# Allegro board parallella_layout.brd
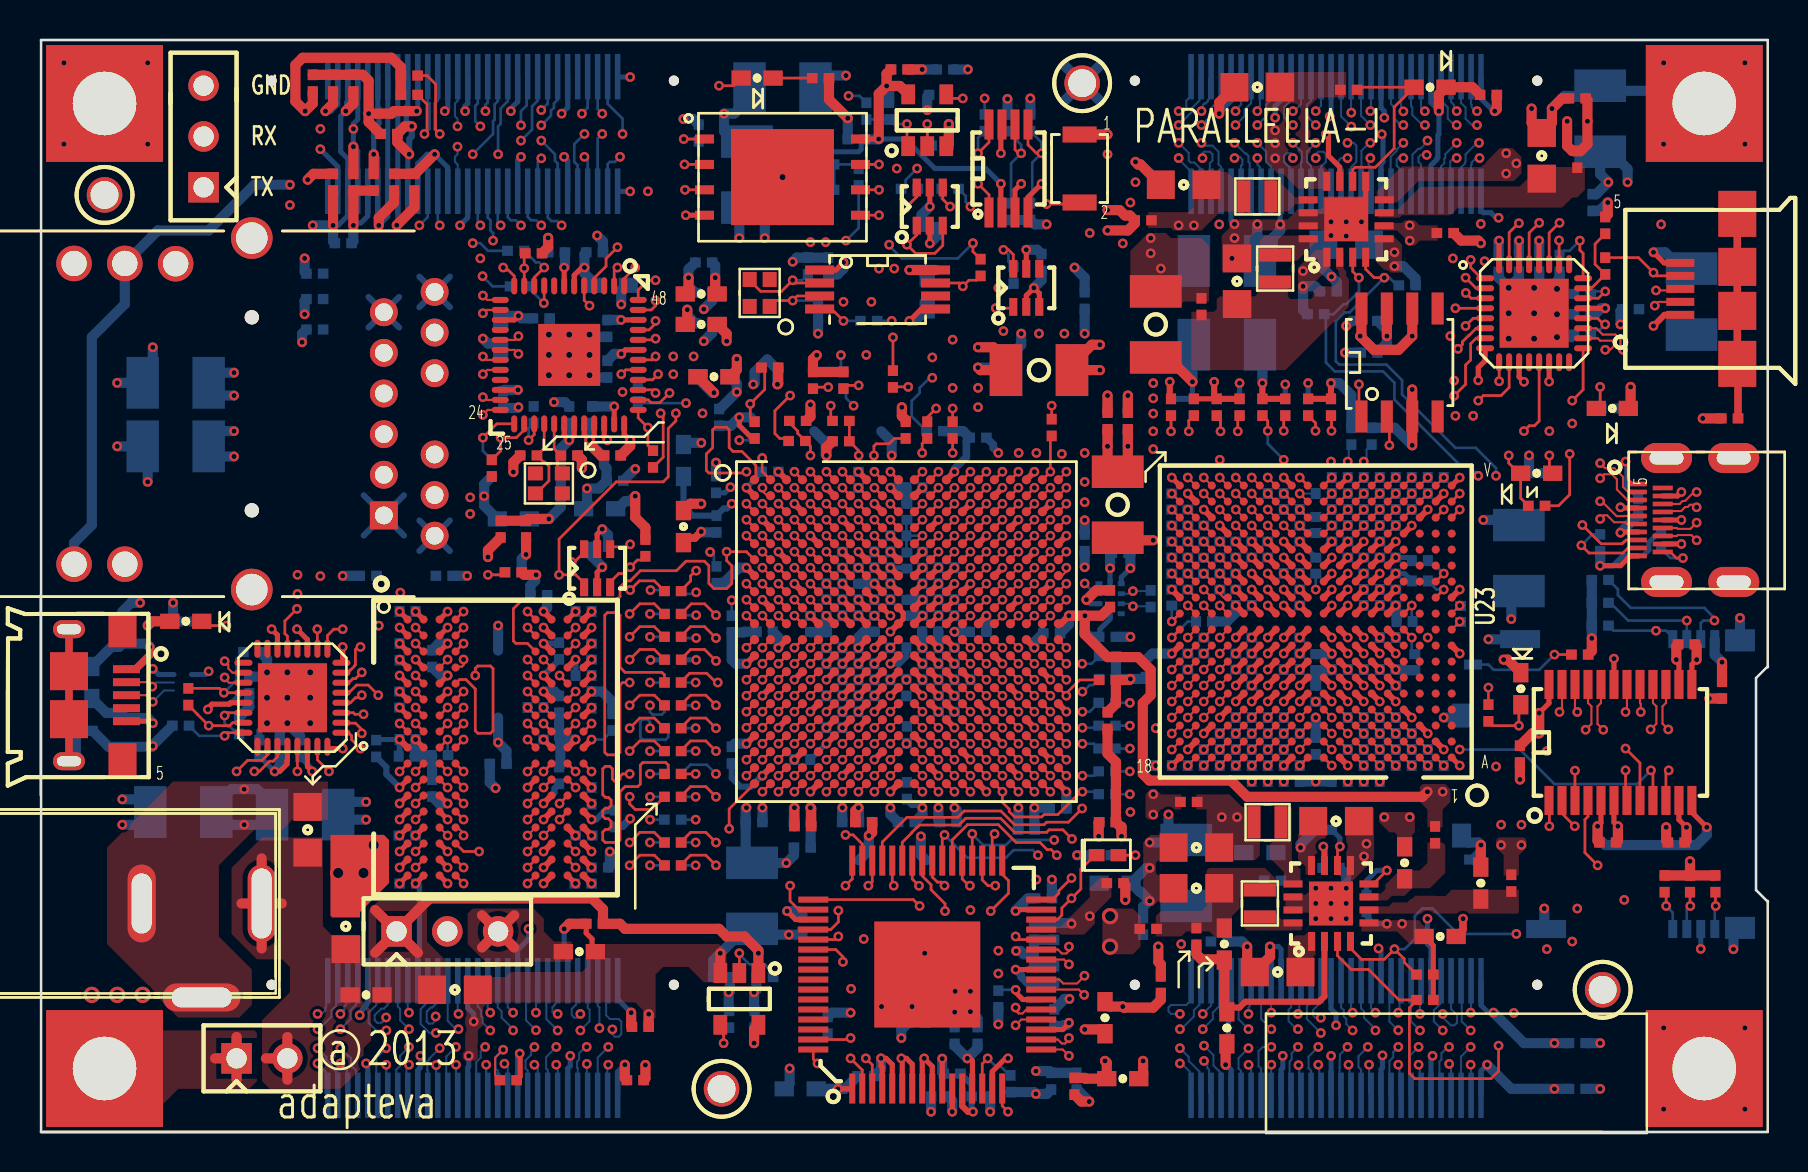
[diagram p0: board, top side]
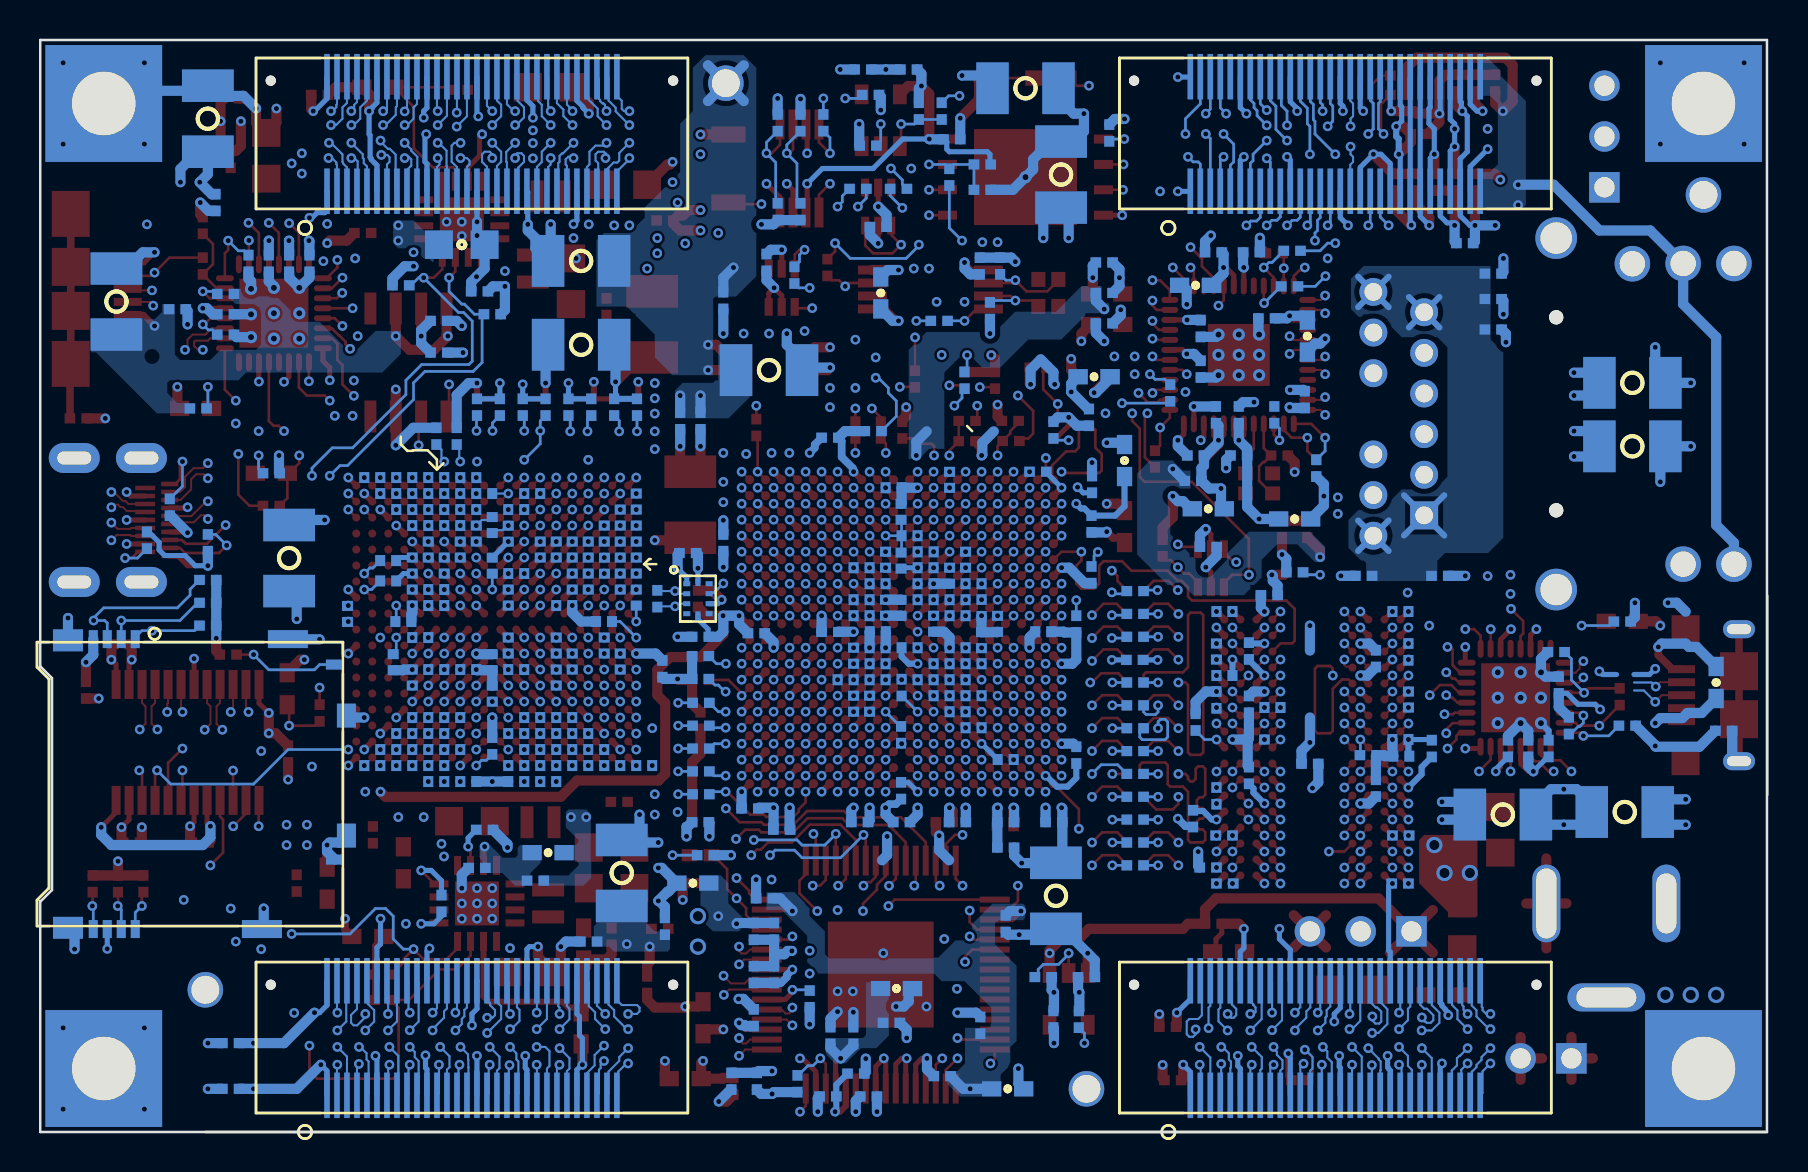
[diagram p1: board, bottom side, seen from below]

Outline 86.43 x 54.61 mm; copper layers: TOP, L2_GND, L3_SIG, L4_GND, L5_SIG, L6_PWR, L7_PWR, L8_SIG, L9_GND, L10_SIG, L11_GND, BOTTOM. Coordinates in mm from the lower left corner of the outline.
Outline path: 0.05,0 0.05,54.61 86.41,54.61 86.41,23.24 ; 0.05,0 78.16,0 ; 0.05,0 86.41,0 86.41,11.56

## Design rules (mm)
net group DDR3_A0: nets DDR3_A0 DDR_A0
net group DDR3_A1: nets DDR3_A1 DDR_A1
net group DDR3_A2: nets DDR3_A2 DDR_A2
net group DDR3_A3: nets DDR3_A3 DDR_A3
net group DDR3_A4: nets DDR3_A4 DDR_A4
net group DDR3_A5: nets DDR3_A5 DDR_A5
net group DDR3_A6: nets DDR3_A6 DDR_A6
net group DDR3_A7: nets DDR3_A7 DDR_A7
net group DDR3_A8: nets DDR3_A8 DDR_A8
net group DDR3_A9: nets DDR3_A9 DDR_A9
net group DDR3_A10: nets DDR3_A10 DDR_A10
net group DDR3_A11: nets DDR3_A11 DDR_A11
net group DDR3_A12: nets DDR3_A12 DDR_A12
net group DDR3_A13: nets DDR3_A13 DDR_A13
net group DDR3_A14: nets DDR3_A14 DDR_A14
net group DDR3_BA0: nets DDR3_BA0 DDR_BA0
net group DDR3_BA1: nets DDR3_BA1 DDR_BA1
net group DDR3_BA2: nets DDR3_BA2 DDR_BA2
net group DDR3_CAS_L: nets DDR3_CAS_L DDR_CAS_L
net group DDR3_CKE: nets DDR3_CKE DDR_CKE
net group DDR3_CS_L: nets DDR3_CS_L DDR_CS_L
net group DDR3_ODT: nets DDR3_ODT DDR_ODT
net group DDR3_RAS_L: nets DDR3_RAS_L DDR_RAS_L
net group DDR3_WE_L: nets DDR3_WE_L DDR_WE_L
net group DDR_ADDR_MATCH: nets DDR_CLK_N DDR_CLK_P
net group HDMI_TX0: nets HDMI_TX0_N HDMI_TX0_P
net group HDMI_TX1: nets HDMI_TX1_N HDMI_TX1_P
net group HDMI_TX2: nets HDMI_TX2_N HDMI_TX2_P
net group HDMI_TXC: nets HDMI_TXC_N HDMI_TXC_P
net group P0_USB_D: nets P0_USB_DN P0_USB_DP
net group P1_USB_D: nets P1_USB_DN P1_USB_DP
net group PHY_MDI0: nets PHY_MDI0N PHY_MDI0P
net group PHY_MDI1: nets PHY_MDI1N PHY_MDI1P
net group PHY_MDI2: nets PHY_MDI2N PHY_MDI2P
net group PHY_MDI3: nets PHY_MDI3N PHY_MDI3P
net group RXI_CCLK: nets RXI_CCLK_N RXI_CCLK_P
net group RXI_EA_DATA0: nets RXI_EA_DATA0_N RXI_EA_DATA0_P
net group RXI_EA_DATA1: nets RXI_EA_DATA1_N RXI_EA_DATA1_P
net group RXI_EA_DATA2: nets RXI_EA_DATA2_N RXI_EA_DATA2_P
net group RXI_EA_DATA3: nets RXI_EA_DATA3_N RXI_EA_DATA3_P
net group RXI_EA_DATA4: nets RXI_EA_DATA4_N RXI_EA_DATA4_P
net group RXI_EA_DATA5: nets RXI_EA_DATA5_N RXI_EA_DATA5_P
net group RXI_EA_DATA6: nets RXI_EA_DATA6_N RXI_EA_DATA6_P
net group RXI_EA_DATA7: nets RXI_EA_DATA7_N RXI_EA_DATA7_P
net group RXI_EA_FRAME: nets RXI_EA_FRAME_N RXI_EA_FRAME_P
net group RXI_EA_LCLK: nets RXI_EA_LCLK_N RXI_EA_LCLK_P
net group RXO_EA_RD_WAIT: nets RXO_EA_RD_WAIT_N RXO_EA_RD_WAIT_P
net group RXO_EA_WR_WAIT: nets RXO_EA_WR_WAIT_N RXO_EA_WR_WAIT_P
net group TXI_EA_RD_WAIT: nets TXI_EA_RD_WAIT_N TXI_EA_RD_WAIT_P
net group TXI_EA_WR_WAIT: nets TXI_EA_WR_WAIT_N TXI_EA_WR_WAIT_P
net group TXO_EA_DATA0: nets TXO_EA_DATA0_N TXO_EA_DATA0_P
net group TXO_EA_DATA1: nets TXO_EA_DATA1_N TXO_EA_DATA1_P
net group TXO_EA_DATA2: nets TXO_EA_DATA2_N TXO_EA_DATA2_P
net group TXO_EA_DATA3: nets TXO_EA_DATA3_N TXO_EA_DATA3_P
net group TXO_EA_DATA4: nets TXO_EA_DATA4_N TXO_EA_DATA4_P
net group TXO_EA_DATA5: nets TXO_EA_DATA5_N TXO_EA_DATA5_P
net group TXO_EA_DATA6: nets TXO_EA_DATA6_N TXO_EA_DATA6_P
net group TXO_EA_DATA7: nets TXO_EA_DATA7_N TXO_EA_DATA7_P
net group TXO_EA_FRAME: nets TXO_EA_FRAME_N TXO_EA_FRAME_P
net group VADC: nets VADC_N VADC_P
net group CONNECTOR1_MATCH: nets RXI_NO_DATA0_N RXI_NO_DATA0_P RXI_NO_DATA1_N RXI_NO_DATA1_P RXI_NO_DATA2_N RXI_NO_DATA2_P RXI_NO_DATA3_N RXI_NO_DATA3_P RXI_NO_DATA4_N RXI_NO_DATA4_P RXI_NO_DATA5_N RXI_NO_DATA5_P RXI_NO_DATA6_N RXI_NO_DATA6_P RXI_NO_DATA7_N RXI_NO_DATA7_P RXI_NO_FRAME_N RXI_NO_FRAME_P RXI_NO_LCLK_N RXI_NO_LCLK_P RXO_NO_RD_WAIT_N RXO_NO_RD_WAIT_P RXO_NO_WR_WAIT_N RXO_NO_WR_WAIT_P TXI_NO_RD_WAIT_N TXI_NO_RD_WAIT_P TXI_NO_WR_WAIT_N TXI_NO_WR_WAIT_P TXO_NO_DATA0_N TXO_NO_DATA0_P TXO_NO_DATA1_N TXO_NO_DATA1_P TXO_NO_DATA2_N TXO_NO_DATA2_P TXO_NO_DATA3_N TXO_NO_DATA3_P TXO_NO_DATA4_N TXO_NO_DATA4_P TXO_NO_DATA5_N TXO_NO_DATA5_P TXO_NO_DATA6_N TXO_NO_DATA6_P TXO_NO_DATA7_N TXO_NO_DATA7_P TXO_NO_FRAME_N TXO_NO_FRAME_P TXO_NO_LCLK_N TXO_NO_LCLK_P
net group CONNECTOR2_MATCH: nets RXI_SO_DATA0_N RXI_SO_DATA0_P RXI_SO_DATA1_N RXI_SO_DATA1_P RXI_SO_DATA2_N RXI_SO_DATA2_P RXI_SO_DATA3_N RXI_SO_DATA3_P RXI_SO_DATA4_N RXI_SO_DATA4_P RXI_SO_DATA5_N RXI_SO_DATA5_P RXI_SO_DATA6_N RXI_SO_DATA6_P RXI_SO_DATA7_N RXI_SO_DATA7_P RXI_SO_FRAME_N RXI_SO_FRAME_P RXI_SO_LCLK_N RXI_SO_LCLK_P RXO_SO_RD_WAIT_N RXO_SO_RD_WAIT_P RXO_SO_WR_WAIT_N RXO_SO_WR_WAIT_P TXI_SO_RD_WAIT_N TXI_SO_RD_WAIT_P TXI_SO_WR_WAIT_N TXI_SO_WR_WAIT_P TXO_SO_DATA0_N TXO_SO_DATA0_P TXO_SO_DATA1_N TXO_SO_DATA1_P TXO_SO_DATA2_N TXO_SO_DATA2_P TXO_SO_DATA3_N TXO_SO_DATA3_P TXO_SO_DATA4_N TXO_SO_DATA4_P TXO_SO_DATA5_N TXO_SO_DATA5_P TXO_SO_DATA6_N TXO_SO_DATA6_P TXO_SO_DATA7_N TXO_SO_DATA7_P TXO_SO_FRAME_N TXO_SO_FRAME_P TXO_SO_LCLK_N TXO_SO_LCLK_P
net group CONNECTOR3_MATCH: nets GPIO0_N GPIO0_P GPIO1_N GPIO1_P GPIO2_N GPIO2_P GPIO3_N GPIO3_P GPIO4_N GPIO4_P GPIO5_N GPIO5_P GPIO6_N GPIO6_P GPIO7_N GPIO7_P GPIO8_N GPIO8_P GPIO9_N GPIO9_P GPIO10_N GPIO10_P GPIO11_N GPIO11_P GPIO12_N GPIO12_P GPIO13_N GPIO13_P GPIO14_N GPIO14_P GPIO15_N GPIO15_P GPIO16_N GPIO16_P GPIO17_N GPIO17_P GPIO18_N GPIO18_P GPIO19_N GPIO19_P GPIO20_N GPIO20_P GPIO21_N GPIO21_P GPIO22_N GPIO22_P GPIO23_N GPIO23_P
net group DDR_DATA_0: nets DDR_DM0 DDR_DQ0 DDR_DQ1 DDR_DQ2 DDR_DQ3 DDR_DQ4 DDR_DQ5 DDR_DQ6 DDR_DQ7 DDR_DQS_N0 DDR_DQS_P0
net group DDR_DATA_1: nets DDR_DM1 DDR_DQ8 DDR_DQ9 DDR_DQ10 DDR_DQ11 DDR_DQ12 DDR_DQ13 DDR_DQ14 DDR_DQ15 DDR_DQS_N1 DDR_DQS_P1
net group DDR_DATA_2: nets DDR_DM2 DDR_DQ16 DDR_DQ17 DDR_DQ18 DDR_DQ19 DDR_DQ20 DDR_DQ21 DDR_DQ22 DDR_DQ23 DDR_DQS_N2 DDR_DQS_P2
net group DDR_DATA_3: nets DDR_DM3 DDR_DQ24 DDR_DQ25 DDR_DQ26 DDR_DQ27 DDR_DQ28 DDR_DQ29 DDR_DQ30 DDR_DQ31 DDR_DQS_N3 DDR_DQS_P3
nets with their own width: min track width 0.508; nets VDD_GPIO

## Placement (name value [footprint] x y rotation side)
C7  0.1UF  [C0402]  27.99 29.26 270 bottom
C9  0.1UF  [C0402]  44.5 45.26 90 bottom
C10  0.1UF  [C0402]  40.82 49.64 270 bottom
C11  0.1UF  [C0402]  84.13 22.1 180 top
C12  100uF  [C1210]  73.97 28.7 0 bottom
C13  4.7UF  [C0402#2]  38.53 25.41 90 bottom
C14  0.47UF  [C0402#2]  39.73 23.42 0 bottom
C15  0.47UF  [C0402#2]  39.73 20.22 0 bottom
C16  0.1UF  [C0402]  33.84 30.4 180 bottom
C17  100uF  [C1210]  6.78 37.47 90 bottom
C18  4.7UF  [C0402#2]  42.13 26.62 0 bottom
C19  4.7UF  [C0402#2]  43.73 32.22 0 bottom
C20  0.47UF  [C0402#2]  44.54 22.62 0 bottom
C21  0.47UF  [C0402]  46.92 34.72 270 bottom
C22  0.47UF  [C0402#2]  41.33 23.42 0 bottom
C23  10nF  [C0402#2]  43.36 28.57 270 bottom
C24  0.1UF  [C0402]  39.42 43.31 0 bottom
C25  0.1UF  [C0402]  13.74 41.66 90 bottom
C26  0.1UF  [C0402]  20.22 27.81 270 bottom
C27  0.1UF  [C0402]  13.74 40.13 90 bottom
C28  0.1UF  [C0402]  16.41 27.81 90 bottom
C31  0.1UF  [C0402]  50.09 43.48 0 bottom
C32  0.1UF  [C0402]  27.74 43.99 270 bottom
C33  10UF  [C0603]  28.63 42.34 270 bottom
C34  10UF  [C0603]  33.07 41.91 90 top
C35  0.1UF  [C0402]  33.2 43.48 270 bottom
C36  0.1UF  [C0402]  26.47 33.83 270 bottom
C37  0.1UF  [C0402]  26.47 35.86 0 bottom
C38  10UF  [C0603]  23.68 30.66 90 bottom
C39  0.1UF  [C0402]  24.31 30.15 0 top
C40  10UF  [C0603]  33.07 40.39 90 top
C41  0.1UF  [C0402]  25.83 43.99 90 bottom
C42  0.1UF  [C0402]  28.37 40.18 180 bottom
C43  0.1UF  [C0402]  28.37 38.15 180 bottom
C44  0.1UF  [C0402]  27.61 35.86 0 bottom
C45  0.1UF  [C0402]  28.63 33.83 270 bottom
C46  0.1UF  [C0402]  23.17 36.63 180 bottom
C47  0.1UF  [C0402]  25.07 40.69 270 bottom
C48  10UF  [C0603]  23.04 39.8 180 bottom
C49  10UF  [C0603]  27.99 31.17 270 bottom
C50  0.1UF  [C0402]  28.63 33.83 90 top
C51  0.1UF  [C0402]  79.56 41.15 90 bottom
C52  0.1UF  [C0402]  66.47 38.98 90 bottom
C53  10UF  [C0603]  44.38 41.96 180 bottom
C54  6pF  [C0402]  38.92 41.07 180 bottom
C55  0.1UF  [C0402]  73.97 43.43 180 bottom
C56  0.1UF  [C0402]  74.98 43.43 180 bottom
C57  2.2UF  [C0402]  77.14 39.88 90 bottom
C58  0.1UF  [C0402]  44.99 1.78 90 bottom
C59  0.1UF  [C0402]  77.14 40.89 90 bottom
C60  0.1UF  [C0402]  72.95 43.43 180 bottom
C61  6pF  [C0402]  38.41 43.31 0 bottom
C62  6pF  [C0402]  26.47 33.83 90 top
C63  4.7UF  [C0603]  2.59 22.48 180 bottom
C64  0.1UF  [C0402]  10.98 19.18 0 bottom
C65  0.1UF  [C0402]  11.99 19.18 0 bottom
C66  2.2UF  [C0402]  10.59 24 270 bottom
C67  0.1UF  [C0402]  41.3 2.79 270 bottom
C68  0.1UF  [C0402]  10.47 22.35 0 bottom
C69  0.1UF  [C0402]  13.01 19.18 0 bottom
C70  100uF  [C1210]  7.17 16 270 bottom
C71  100uF  [C1210]  13.26 15.88 90 bottom
C72  4.7UF  [C0402]  34.6 18.85 180 bottom
C73  4.7UF  [C0402]  25.96 24.05 0 bottom
C74  4.7UF  [C0402#2]  36.25 25.02 180 bottom
C75  0.47UF  [C0402]  36.51 33.02 90 bottom
C76  0.47UF  [C0402#2]  38.13 18.63 0 bottom
C77  0.47UF  [C0402]  28.76 15.67 0 bottom
C78  0.47UF  [C0402]  33.81 32.38 180 bottom
C79  0.47UF  [C0402]  19.61 17.2 0 bottom
C80  0.47UF  [C0402]  31.68 23.61 90 bottom
C81  0.47UF  [C0402]  19.61 23.67 0 bottom
C82  10nF  [C0402#2]  39.73 21.82 0 bottom
C83  0.1UF  [C0402#2]  39.73 27.42 180 bottom
C84  100uF  [C1210]  82.6 41.53 0 bottom
C85  6pF  [C0402]  24.44 33.83 270 top
C95  10nF  [C0402]  28.63 20.5 0 bottom
C96  0.1UF  [C0402#2]  18.39 19.63 180 bottom
C97  4.7UF  [C0402]  27.59 21.61 0 bottom
C98  4.7UF  [C0402#2]  17.99 21.63 90 bottom
C99  4.7UF  [C0402]  24.95 26.85 270 bottom
C100  0.47UF  [C0402#2]  27.19 22.83 0 bottom
C101  0.47UF  [C0402#2]  27.59 24.03 270 bottom
C102  0.47UF  [C0402#2]  27.19 26.03 180 bottom
C103  0.47UF  [C0402#2]  18.39 26.03 0 bottom
C104  0.047UF  [C0402]  18.37 14.83 90 bottom
C105  0.047UF  [C0402]  17.99 24.01 180 bottom
C106  0.047UF  [C0402]  27.59 16.81 180 bottom
C107  0.047UF  [C0402]  25.96 21.39 180 bottom
C108  0.047UF  [C0402]  22.91 18.41 270 bottom
C109  0.047UF  [C0402]  18.4 12.43 270 bottom
C110  0.047UF  [C0402]  25.96 17.83 0 bottom
C111  0.047UF  [C0402]  27.2 14.83 270 bottom
C112  0.047UF  [C0402]  28.01 13.23 270 bottom
C113  0.047UF  [C0402]  27.17 12.43 90 bottom
C126  0.47UF  [C0402]  14.66 47.5 180 top
C127  0.47UF  [C0402]  56.06 7.37 0 top
C128  0.47UF  [C0402]  49.33 15.11 270 bottom
C129  0.47UF  [C0402]  53.39 15.49 90 top
C130  0.47UF  [C0402]  43.36 17.07 180 bottom
C131  4.7UF  [C0402]  55.3 23.16 0 bottom
C132  4.7UF  [C0402]  53.39 20.57 0 top
C133  4.7UF  [C0402]  50.92 16.18 90 bottom
C134  100uF  [C1210]  57.33 12.95 0 bottom
C135  0.47UF  [C0402]  54.41 35.56 180 bottom
C136  0.47UF  [C0402]  53.39 35.56 0 top
C137  0.47UF  [C0402]  50.6 24.94 90 bottom
C138  0.47UF  [C0402]  54.41 35.56 0 top
C139  0.47UF  [C0402]  53.39 35.56 180 bottom
C140  4.7UF  [C0402]  46.92 25.01 270 bottom
C141  4.7UF  [C0402]  52.25 29.46 180 bottom
C142  4.7UF  [C0402]  53.39 24.77 270 bottom
C143  100uF  [C1210]  49.96 38.1 90 bottom
C144  0.1UF  [C0402]  50.73 7.87 0 bottom
C145  0.1UF  [C0402]  50.73 5.71 0 bottom
C149  4.7UF  [C0402#2]  45.74 21.42 90 bottom
C150  4.7UF  [C0402]  38.15 15.29 90 top
C151  4.7UF  [C0402]  52.25 41.58 180 bottom
C152  4.7UF  [C0402]  43.33 15.49 270 bottom
C153  4.7UF  [C0402]  45.43 15.49 270 bottom
C154  0.47UF  [C0402]  40.54 15.49 270 bottom
C155  0.47UF  [C0402]  35.71 15.49 270 bottom
C156  0.47UF  [C0402]  38.13 15.49 270 bottom
C157  0.47UF  [C0402#2]  45.74 23.82 270 bottom
C158  0.47UF  [C0402#2]  46.14 22.62 0 bottom
C159  0.47UF  [C0402#2]  45.34 26.62 180 bottom
C160  0.47UF  [C0402#2]  45.34 25.82 0 bottom
C162  4.7UF  [C0402#2]  43.36 26.21 270 bottom
C164  0.47UF  [C0402#2]  44.54 24.22 0 bottom
C165  0.47UF  [C0402#2]  42.13 22.62 0 bottom
C168  100uF  [C1210]  59.36 43.56 270 bottom
C169  4.7UF  [C0402#2]  42.13 27.42 180 bottom
C170  0.47UF  [C0402#2]  40.53 24.22 0 bottom
C171  0.47UF  [C0402#2]  44.14 28.62 90 bottom
C172  10UF  [C0603]  33.71 37.77 90 top
C173  100uF  [C1210]  59.36 39.37 90 bottom
C174  4.7UF  [C0402]  33.96 35.74 180 bottom
C175  4.7UF  [C0402#2]  44.52 25.02 0 bottom
C176  0.47UF  [C0402#2]  42.13 28.22 0 bottom
C177  0.47UF  [C0402#2]  44.14 26.22 270 bottom
C178  0.47UF  [C0402#2]  40.53 25.82 180 bottom
C179  100uF  [C1210]  37.14 52.2 90 bottom
C180  4.7UF  [C0402#2]  40.53 22.62 0 bottom
C181  4.7UF  [C0402#2]  40.13 28.62 90 bottom
C182  4.7UF  [C0402]  38.13 14.22 270 bottom
C183  0.47UF  [C0402#2]  44.54 27.42 180 bottom
C184  0.47UF  [C0402#2]  40.53 21.02 0 bottom
C185  0.47UF  [C0402#2]  44.54 23.42 180 bottom
C186  0.47UF  [C0402#2]  40.53 26.62 0 bottom
C187  0.47UF  [C0402#2]  41.33 21.82 0 bottom
C188  0.47UF  [C0402]  76.89 51.69 270 top
C189  0.47UF  [C0402]  74.02 18.9 0 top
C190  0.47UF  [C0402]  41.2 15.49 270 top
C191  0.47UF  [C0402]  15.17 44.45 270 bottom
C192  4.7UF  [C0402]  53.39 15.49 270 bottom
C193  4.7UF  [C0402]  34.09 7.75 90 bottom
C194  100uF  [C1210]  6.78 34.29 90 bottom
C195  100uF  [C1210]  53.9 31.37 180 top
C196  0.1UF  [C0402]  50.73 10.03 180 bottom
C197  0.1UF  [C0402#2]  63.81 23.5 90 bottom
C198  10nF  [C0402#2]  61.41 29.13 270 bottom
C199  0.1UF  [C0402#2]  59.81 29.13 270 bottom
C200  10nF  [C0402#2]  59.81 27.53 270 bottom
C201  0.1UF  [C0402#2]  65.41 29.13 270 bottom
C202  10nF  [C0402#2]  67.01 29.13 270 bottom
C203  0.1UF  [C0402#2]  67.81 28.33 270 bottom
C204  10nF  [C0402#2]  67.81 26.73 270 bottom
C205  0.1UF  [C0402#2]  67.41 24.73 180 bottom
C206  10nF  [C0402#2]  67.81 22.73 270 bottom
C207  0.1UF  [C0402#2]  66.61 23.13 0 bottom
C208  10nF  [C0402#2]  65.01 23.13 0 bottom
C209  0.1UF  [C0402#2]  59.81 23.53 270 bottom
C210  10nF  [C0402#2]  60.21 26.33 0 bottom
C211  0.1UF  [C0402#2]  60.61 22.73 270 bottom
C212  10nF  [C0402#2]  62.61 23.13 0 bottom
C213  0.1UF  [C0402#2]  66.61 27.13 0 bottom
C214  100uF  [C1210]  49.96 38.1 270 top
C215  0.1UF  [C0402#2]  62.61 27.93 180 bottom
C216  100uF  [C1210]  35.61 11.81 180 bottom
C217  0.1UF  [C0402#2]  60.61 29.13 90 bottom
C218  100uF  [C1210]  55.81 40.39 0 top
C219  0.1UF  [C0402#2]  66.21 28.33 270 bottom
C221  0.1UF  [C0402#2]  60.61 24.33 270 bottom
C223  0.1UF  [C0402#2]  63.01 24.33 90 bottom
C225  0.1UF  [C0402#2]  63.01 26.73 90 bottom
C227  0.1UF  [C0402#2]  66.61 26.33 180 bottom
C230  10nF  [C0402]  50.19 11.68 270 bottom
C231  10nF  [C0402]  38.13 10.41 180 bottom
C232  10UF  [C0603]  38.03 2.16 90 bottom
C233  10nF  [C0402]  50.57 2.54 180 bottom
C234  10nF  [C0402]  49.71 7.87 0 bottom
C235  10UF  [C0603]  53.27 5.71 180 top
C236  6800PF  [C0805]  13.39 15.11 180 top
C237  6800PF  [C0805]  15.29 10.29 180 top
C238  10UF  [C0805]  20.75 7.11 90 top
C239  0.1UF  [C0402]  78.41 14.48 90 top
C241  10UF  [C0805]  61.9 8 270 top
C242  0.047UF  [C0402]  57.84 9.78 0 top
C243  10UF  [C0805]  57.84 12.19 270 top
C244  0.047UF  [C0402]  61.65 12.57 270 bottom
C245  10UF  [C0805]  57.84 14.22 270 top
C247  10UF  [C0805]  60.89 52.25 270 top
C248  10UF  [C0805]  59.87 42.55 180 top
C250  10UF  [C0805]  57.2 47.37 270 top
C251  1UF  [C0603]  72.06 12.45 180 top
C252  1UF  [C0603]  68.25 13.46 180 top
C253  10UF  [C0805]  64.82 15.54 90 top
C254  1UF  [C0603]  70.03 9.78 90 top
C255  10UF  [C0805]  65.33 44.37 90 bottom
C256  10UF  [C0805]  75.11 48.82 180 top
C257  10UF  [C0603]  53.77 12.45 270 bottom
C258  0.1UF  [C0402]  81.84 14.48 270 top
C259  0.1UF  [C0402]  42.98 53.14 270 top
C260  0.1UF  [C0402]  84.51 35.69 270 top
C261  0.1UF  [C0402]  2.21 20.07 270 bottom
C262  10nF  [C0402]  49.71 10.03 180 bottom
C263  0.1UF  [C0402]  45.75 4.83 0 bottom
C264  0.1UF  [C0402]  47.02 1.78 270 bottom
C265  10nF  [C0402]  45.62 2.92 90 bottom
C266  10nF  [C0402]  46.89 4.83 0 bottom
C267  10UF  [C0603]  43.59 7.18 90 bottom
C268  0.47UF  [C0402]  30.03 5.26 90 top
C269  0.47UF  [C0402]  29.77 2.59 90 top
C270  0.47UF  [C0402]  76.89 2.16 270 bottom
C271  0.47UF  [C0402]  76.89 4.45 270 bottom
C272  0.47UF  [C0402]  72.44 51.87 270 top
C273  0.47UF  [C0402]  77.65 46.48 180 bottom
C274  0.47UF  [C0402]  64.44 42.04 270 bottom
C275  0.47UF  [C0402]  17.45 49.91 270 top
C276  0.47UF  [C0402]  17.71 47.5 180 top
C277  0.47UF  [C0402]  18.72 47.5 180 top
C278  0.47UF  [C0402]  16.69 47.5 0 top
C279  0.47UF  [C0402]  66.47 40.56 90 bottom
C281  100uF  [C1210]  78.03 50.67 0 bottom
C282  4.7UF  [C0402#2]  45.34 28.22 180 bottom
C283  0.47UF  [C0402#2]  44.94 21.42 270 bottom
C284  4.7UF  [C0402]  58.98 9.53 270 bottom
C285  0.47UF  [C0402]  55.17 10.29 0 bottom
C286  100uF  [C1210]  35.36 47.88 0 bottom
C287  4.7UF  [C0603]  26.98 9.02 90 top
C288  0.1UF  [C0402]  35.74 5.64 180 bottom
C289  0.1UF  [C0402]  82.35 24.38 270 top
C290  0.1UF  [C0402]  45.27 53.14 90 bottom
C291  0.1UF  [C0402]  42.98 53.14 270 bottom
C292  0.47UF  [C0402]  15.67 47.5 0 top
C293  0.47UF  [C0402]  15.67 52.45 180 top
C294  0.47UF  [C0402]  14.66 52.45 180 top
C295  0.47UF  [C0402]  13.64 52.45 180 top
C296  10UF  [C0603]  54.16 2.67 90 top
C297  0.1UF  [C0402]  53.52 26.67 0 top
C298  0.1UF  [C0402]  54.03 28.96 270 bottom
C307  0.47UF  [C0402#2]  40.93 27.82 270 bottom
CR1  RED  [LED_0603]  74.06 22.17 180 top
CR4  GREEN  [LED_0603]  78.64 36.19 270 top
CR5  RED  [LED_0603]  74.86 32.94 90 top
CR6  GREEN  [LED_0603]  7.29 25.54 90 top
CR8  GREEN  [LED_0603]  69.52 52.25 270 top
CR10  GREEN  [LED_0603]  35.87 52.7 270 top
D1  2mA_75V  [SOD-523]  53.39 13.84 0 top
F1  4A  [F0603]  16.31 6.86 90 top
FB1  120-OHM_3A  [BEAD_0603]  32.18 30.28 0 top
FB2  120-OHM_3A  [BEAD_0603]  32.18 33.58 180 bottom
FB3  120-OHM@100MHz  [FBEAD_0402]  13.74 42.93 90 bottom
FB4  120-OHM@100MHz  [FBEAD_0402]  33.2 41.96 90 bottom
FB5  120-OHM@100MHz  [FBEAD_0402]  23.04 30.15 0 top
FB6  120-OHM@100MHz  [FBEAD_0402]  33.2 40.44 90 bottom
FB7  120-OHM@100MHz  [FBEAD_0402]  28.76 32.56 270 bottom
FB12  120-OHM_3A  [BEAD_0603]  33.71 37.77 90 bottom
FB14  120-OHM@100MHz  [FBEAD_0402]  39.4 5.33 180 bottom
FB15  120-OHM@100MHz  [FBEAD_0402]  51.84 2.54 0 bottom
FB16  120-OHM@100MHz  [FBEAD_0402]  53.77 12.45 90 top
FB17  120-OHM@100MHz  [FBEAD_0402]  43.84 5.46 270 bottom
FB18  120-OHM@100MHz  [FBEAD_0402]  51.74 2.29 180 top
J2  -  [HDR_1X3_TH_VER]  8.18 47.24 90 top
J3  MicroSD_CARD  [SDMICRO_8PIN_REV_15SQX1P51MMH]  71.43 17.4 270 bottom
J5  RJ-45  [RJ45_17PINS_2LED]  17.2 30.84 90 top
J6  USB_MICRO_AB_RA  [USB_MICRO5P_5X7X3P07MMH]  84.89 42.16 180 top
J7  USB_MICRO_B_RA  [USB_MICROB_5P05X7P86X3P1MMH_R]  1.45 21.84 270 top
J8  BSH-030-01-F-D-A  [CONN_BSH60P_13P59X25P88_P5P_V]  64.82 4.7 180 bottom
J9  BSH-030-01-F-D-A  [CONN_BSH60P_13P59X25P88_P5P_V]  64.82 49.91 180 bottom
J10  HDMI_MICRO_D_RA  [HDMI_MICRO19_6P5X7P5X2P9H_P4P]  86.41 30.61 90 top
J11  BSH-030-01-F-D-A  [CONN_BSH60P_13P59X25P88_P5P_V]  21.64 4.7 180 bottom
J12  PJ-002A  [DC_PWR_JCK_9X14P4X11MMH]  11.09 11.43 180 top
J13  BSH-030-01-F-D-A  [CONN_BSH60P_13P59X25P88_P5P_V]  21.64 49.91 180 bottom
J14  -  [HDR_1X3_TH_VER]  17.83 10.03 0 top
J15  -  [HDR_1X2_TH_VER]  9.83 3.68 0 top
L8  1.5uH  [IND2_2X2P5X1P2MMH]  61.01 11.43 90 top
L9  1.5uH  [IND2_2X2P5X1P2MMH]  61.39 15.49 180 top
L10  1.5uH  [IND2_2X2P5X1P2MMH]  60.89 46.79 180 top
L11  1.5uH  [IND2_2X2P5X1P2MMH]  61.78 43.18 270 top
NOREF  -  []  0.05 54.61 0 top
NOREF#2  -  []  0.05 0 0 top
NOREF#3  -  []  0.05 0 0 top
NOREF#4  -  []  86.41 11.56 0 top
NOREF#5  -  []  89.33 -22.35 0 top
NOREF#6  -  []  -186 -266.67 0 top
PTH1  -  [PTH125_200PAD]  3.23 3.17 0 top
PTH2  -  [PTH125_200PAD]  83.24 3.17 0 top
PTH3  -  [PTH125_200PAD]  83.24 51.44 0 top
PTH4  -  [PTH125_200PAD]  3.23 51.44 0 top
R1  240  [R0402]  72.44 20.95 0 top
R3  240  [R0402]  43.36 19.86 180 bottom
R4  4.75K  [R0402]  43.33 22.23 0 bottom
R8  4.75K  [R0402#2]  39.34 24.59 90 bottom
R9  4.75K  [R0402]  18.47 52.83 270 top
R10  4.75K  [R0402]  18.47 51.87 270 top
R11  1K  [R0402#2]  42.13 29.01 0 bottom
R12  4.75K  [R0402]  39.33 26.21 180 bottom
R18  4.75K  [R0402]  53.39 23.8 90 bottom
R19  4.75K  [R0402]  78.03 29.46 180 bottom
R20  4.75K  [R0402]  53.39 22.66 90 bottom
R21  4.75K  [R0402]  81.08 29.59 0 bottom
R22  4.75K  [R0402]  53.39 22.61 90 top
R24  4.75K  [R0402]  79.94 31.24 180 bottom
R28  1K  [R0402]  32.95 49.96 180 bottom
R30  240  [R0402]  39.04 52.7 90 top
R32  33  [R0402]  44.38 35.1 180 top
R33  4.75K  [R0402]  83.8 12.41 180 top
R34  4.75K  [R0402]  78.03 26.47 90 bottom
R35  4.75K  [R0402]  78.03 25.32 90 bottom
R36  4.75K  [R0402]  81.26 12.41 180 top
R37  4.75K  [R0402]  82.53 12.41 180 top
R38  4.75K  [R0402]  77.02 23.88 90 top
R39  4.75K  [R0402]  78.03 27.61 90 bottom
R40  4.75K  [R0402]  30.28 29.21 0 top
R41  22.1  [R0402]  53.37 21.46 270 bottom
R42  22.1  [R0402]  53.37 19.18 270 bottom
R43  20K  [R0402]  37.9 35.56 270 top
R44  22.1  [R0402]  53.37 20.32 270 bottom
R45  20K  [R0402]  40.06 34.54 90 top
R46  20K  [R0402]  36.5 38.23 90 top
R47  20K  [R0402]  35.74 35.1 0 top
R48  20K  [R0402]  43.3 35.1 180 top
R49  20K  [R0402#2]  40.93 32.61 90 bottom
R50  20K  [R0402]  40.19 37.59 0 top
R51  20K  [R0402]  38.66 37.59 0 top
R52  20K  [R0402]  39.3 48.39 270 bottom
R55  22.1  [R0402]  47.04 43.23 180 top
R56  22.1  [R0402]  41.46 40.56 270 bottom
R59  0  [R0402]  50.6 35.23 180 top
R60  0  [R0402]  42.66 37.66 180 top
R61  4.75K  [R0402]  44.76 35.05 270 bottom
R62  1K  [R0402#2]  43.36 31.02 270 bottom
R63  1K  [R0402#2]  42.94 29.82 180 bottom
R66  1K  [R0402]  23.68 27.99 270 top
R67  1K  [R0402]  23.68 27.99 270 bottom
R69  1K  [R0402]  16.82 19.18 0 bottom
R70  1K  [R0402#2]  18.34 18.8 0 bottom
R71  0  [R0402]  29.9 36.96 0 bottom
R72  100  [R0402]  23.8 44.07 90 bottom
R73  100  [R0402]  23.93 42.29 90 bottom
R74  0  [R0402]  24.69 43.94 90 top
R75  0  [R0402]  37.86 34.56 270 top
R76  0  [R0402]  39.3 47.12 270 bottom
R77  0  [R0402]  24.69 35.86 0 bottom
R78  0  [R0402]  22.6 33.2 0 top
R79  4.99K  [R0402]  22.6 33.2 180 bottom
R80  0  [R0402#2]  42.93 24.22 180 bottom
R81  0  [R0402#2]  41.73 25.42 90 bottom
R82  22.1  [R0402]  53.37 16.89 270 bottom
R84  620  [R0402]  78.51 36.19 270 bottom
R85  0  [R0402]  78.29 43.31 180 top
R86  1K  [R0402]  77.14 41.91 90 bottom
R89  240  [R0402]  74.86 32.94 270 bottom
R90  8.06K  [R0402]  76 43.43 180 bottom
R94  22.1  [R0402]  53.37 18.03 270 bottom
R95  0  [R0402]  40.19 37.59 180 bottom
R96  0  [R0402]  47.25 50.47 0 bottom
R97  0  [R0402]  40.95 47.75 180 bottom
R98  0  [R0402]  41.33 51.05 0 bottom
R99  22.1  [R0402]  43.49 47.17 90 bottom
R100  620  [R0402]  7.29 25.53 90 bottom
R101  0  [R0402]  7.42 21.77 180 top
R103  10K  [R0402]  9.96 20.32 0 bottom
R106  8.06K  [R0402]  7.04 20.32 90 bottom
R110  22.1  [R0402]  45.52 47.17 270 bottom
R111  4.75K  [R0402]  35.74 35.1 0 bottom
R112  80.6  [R0402]  33.84 27.86 180 bottom
R113  80.6  [R0402]  34.6 25.4 180 bottom
R114  22.1  [R0402]  48.69 42.85 180 bottom
R115  80.6  [R0402#2]  24.79 21.23 0 bottom
R116  0  [R0402]  78.29 45.34 180 top
R119  240  [R0402]  19.99 18.85 90 bottom
R120  240  [R0402]  25.6 19.63 270 bottom
R156  4.75K  [R0402]  56.57 36.25 180 top
R157  4.75K  [R0402]  63.43 36.25 180 top
R158  4.75K  [R0402]  60 36.25 180 top
R159  4.75K  [R0402]  64.57 36.25 180 top
R160  1K  [R0402]  56.57 36.25 0 bottom
R161  4.75K  [R0402]  58.85 36.25 180 top
R162  4.75K  [R0402]  57.71 36.25 180 top
R163  4.75K  [R0402]  61.14 36.25 180 top
R164  4.75K  [R0402]  62.28 36.25 180 top
R165  1K  [R0402]  63.43 36.25 0 bottom
R166  1K  [R0402]  60 36.25 0 bottom
R167  1K  [R0402]  64.57 36.25 0 bottom
R168  1K  [R0402]  58.85 36.25 0 bottom
R169  1K  [R0402]  57.71 36.25 0 bottom
R170  1K  [R0402]  61.14 36.25 0 bottom
R171  1K  [R0402]  62.28 36.25 0 bottom
R178  1K  [R0402#2]  56.21 18.33 180 bottom
R179  4.75K  [R0402#2]  63.81 21.92 90 bottom
R180  100  [R0402#2]  56.61 31.53 270 bottom
R181  100  [R0402#2]  57.41 30.73 270 bottom
R182  100  [R0402#2]  58.21 29.93 270 bottom
R183  100  [R0402#2]  59.01 29.13 270 bottom
R184  100  [R0402#2]  56.61 29.93 270 bottom
R185  100  [R0402#2]  57.41 29.13 270 bottom
R186  100  [R0402#2]  58.19 28.32 270 bottom
R187  100  [R0402#2]  59.01 27.53 270 bottom
R188  100  [R0402#2]  57.41 27.53 270 bottom
R189  100  [R0402#2]  56.61 28.33 270 bottom
R190  100  [R0402#2]  57.41 23.53 270 bottom
R191  100  [R0402#2]  58.21 24.33 270 bottom
R192  100  [R0402#2]  71.05 25.91 90 bottom
R193  100  [R0402]  55.55 26.67 180 bottom
R194  100  [R0402#2]  69.81 18.33 0 bottom
R195  100  [R0402#2]  69.01 19.13 0 bottom
R196  100  [R0402#2]  68.21 19.93 0 bottom
R197  100  [R0402#2]  67.41 20.73 0 bottom
R198  100  [R0402#2]  68.21 18.33 0 bottom
R199  100  [R0402#2]  67.41 19.13 0 bottom
R200  100  [R0402#2]  66.61 19.93 0 bottom
R201  100  [R0402#2]  65.81 20.73 0 bottom
R202  100  [R0402#2]  65.81 19.13 0 bottom
R203  100  [R0402#2]  66.61 18.33 0 bottom
R204  100  [R0402#2]  61.81 19.13 0 bottom
R205  100  [R0402#2]  62.61 19.93 0 bottom
R206  100  [R0402#2]  61.01 18.33 0 bottom
R207  100  [R0402#2]  69.81 32.73 180 bottom
R208  100  [R0402#2]  69.01 31.93 180 bottom
R209  100  [R0402#2]  68.21 31.13 180 bottom
R210  100  [R0402#2]  67.41 30.33 180 bottom
R211  100  [R0402#2]  68.21 32.73 180 bottom
R212  100  [R0402#2]  67.41 31.93 180 bottom
R213  100  [R0402#2]  66.61 31.13 180 bottom
R214  100  [R0402#2]  65.81 30.33 180 bottom
R215  100  [R0402#2]  65.81 31.93 180 bottom
R216  100  [R0402#2]  66.61 32.73 180 bottom
R217  100  [R0402#2]  61.81 31.93 180 bottom
R218  100  [R0402#2]  62.61 31.13 180 bottom
R219  0  [R0402#2]  69.01 27.56 0 bottom
R220  0  [R0402#2]  69.01 28.57 0 bottom
R221  0  [R0402#2]  56.61 26.73 270 bottom
R222  0  [R0402#2]  58.22 25.53 180 bottom
R223  1K  [R0402]  23.42 2.59 270 top
R224  887  [R0402]  48.54 2.41 180 bottom
R225  27.4K  [R0402]  53.14 13.84 270 bottom
R226  100  [R0402#2]  57.81 18.33 0 bottom
R227  100  [R0402#2]  58.61 19.13 0 bottom
R228  100  [R0402#2]  59.41 19.93 0 bottom
R229  100  [R0402#2]  60.21 20.73 0 bottom
R230  100  [R0402#2]  59.41 18.33 0 bottom
R231  100  [R0402#2]  60.21 19.13 0 bottom
R232  100  [R0402#2]  61.01 19.93 0 bottom
R233  100  [R0402#2]  61.81 20.73 0 bottom
R234  100  [R0402#2]  64.21 31.93 180 bottom
R235  100  [R0402#2]  65.01 31.13 180 bottom
R236  100  [R0402#2]  63.81 30.35 270 bottom
R237  1K  [R0402]  47.93 6.65 180 bottom
R238  0  [R0402#2]  68.76 23.5 270 bottom
R239  0  [R0402#2]  68.25 25.53 180 bottom
R240  10K  [R0402#2]  62.61 17.53 0 bottom
R241  10K  [R0402#2]  61.01 17.53 180 bottom
R242  10K  [R0402#2]  66.61 17.53 180 bottom
R243  10K  [R0402#2]  65.01 17.53 0 bottom
R244  10K  [R0402#2]  63.01 29.92 270 bottom
R245  10K  [R0402#2]  64.61 29.93 270 bottom
R246  10K  [R0402]  66.6 34.8 180 bottom
R247  10K  [R0402]  65.59 34.8 180 bottom
R273  10K  [R0402]  27.74 10.41 270 top
R276  10K  [R0402]  69.27 6.6 90 top
R277  10K  [R0402]  64.19 15.11 90 bottom
R278  24.9K  [R0603]  59.24 9.4 0 top
R279  100K  [R0603]  59.36 5.21 0 top
R280  10K  [R0402]  69.27 7.87 90 top
R281  56.2K  [R0402]  64.57 13.21 270 bottom
R282  69.8K  [R0603]  61.01 13.97 270 bottom
R283  10K  [R0402]  66.35 11.43 180 bottom
R284  10K  [R0402]  63.81 40.89 270 bottom
R285  10K  [R0402]  68.38 42.34 90 bottom
R286  0  [R0402]  55.43 10.16 270 top
R287  0  [R0402]  57.46 16.51 270 top
R288  620  [R0402]  65.46 52.12 270 top
R289  0  [R0402#2]  62.61 18.33 0 bottom
R290  0  [R0402]  63.81 19.3 180 bottom
R291  0  [R0402#2]  65.01 32.73 180 bottom
R292  0  [R0402#2]  63.81 28.32 270 bottom
R293  0  [R0402]  73.59 12.45 180 top
R294  1K  [R0402]  45.01 49.33 270 bottom
R295  1K  [R0402]  44.88 51.87 270 bottom
R296  0  [R0402]  45.65 35.1 180 top
R297  0  [R0402]  30.66 33.66 180 top
R298  10K  [R0402]  49.53 50.47 180 bottom
R299  10K  [R0402]  48.39 46.02 0 bottom
R300  4.75K  [R0402]  48.39 50.47 0 bottom
R301  10K  [R0402]  49.53 46.02 0 bottom
R302  33  [R0402]  31.65 25.91 90 bottom
R303  33  [R0402]  31.65 27.05 90 bottom
R304  33  [R0402]  31.65 27.05 270 top
R305  33  [R0402]  31.65 24.77 90 bottom
R306  33  [R0402]  31.65 25.91 270 top
R307  33  [R0402]  31.65 23.62 270 top
R308  33  [R0402]  31.65 22.48 90 bottom
R309  33  [R0402]  31.65 21.34 90 bottom
R310  33  [R0402]  31.65 16.76 90 bottom
R311  33  [R0402]  31.65 20.19 270 top
R312  33  [R0402]  31.65 17.91 90 bottom
R313  33  [R0402]  31.65 21.34 270 top
R314  33  [R0402]  31.65 19.05 270 top
R315  33  [R0402]  31.65 22.48 270 top
R316  33  [R0402]  31.65 19.05 90 bottom
R317  33  [R0402]  31.65 24.77 270 top
R318  33  [R0402]  31.65 15.62 90 bottom
R319  33  [R0402]  31.65 16.76 270 top
R320  33  [R0402]  31.65 14.48 90 bottom
R321  33  [R0402]  31.65 20.19 90 bottom
R322  33  [R0402]  31.65 14.48 270 top
R323  33  [R0402]  31.65 13.34 90 bottom
R324  33  [R0402]  31.65 13.34 270 top
R325  10  [R0402]  31.65 17.91 270 top
R326  10K  [R0402]  42.47 51.05 0 bottom
R327  1K  [R0402]  36.25 7.75 90 bottom
R328  1K  [R0402]  34.47 5.64 180 bottom
R329  0  [R0402]  69.78 14.86 180 top
R330  0  [R0402]  58.09 41.27 180 top
R331  0  [R0402]  55.17 45.59 270 top
R332  0  [R0402]  70.28 44.96 90 top
R333  0  [R0402]  76.89 48.64 180 top
R334  0  [R0402]  40.06 35.56 270 top
R335  0  [R0402]  74.86 31.32 90 top
SW2  SW_PB_VERT  [SWITCH_2P5X4X1P6MMH]  52 48.18 270 top
TP12  BLACK  [TP55]  78.16 7.11 0 top
TP13  RED  [TP55]  52.12 52.45 0 top
TP14  BLACK  [TP55]  34.09 2.16 0 top
TP15  RED  [TP55]  3.23 46.86 0 top
U2  7Z020-CLG400  [CBGA400_17SQ_1P6H_P8MMP]  43.33 25.02 0 top
U5  NC7WZ16  [SC_70_6PSMT]  27.87 28.19 0 top
U7  SPI-FLASH-QUAD  [VPDFN-8_6X8XP85H_1P27MMP]  37.14 47.75 0 top
U9  88E1318_1.8V IO  [QFN48_7SQXP5PX1MMH_3P1PAD]  26.47 38.86 270 top
U11  NC7WZ16  [SC_70_6PSMT]  44.5 46.28 0 top
U12  USB_ULPI_XCVR  [QFN32_5SQXP9H_P5MMP_3P45PAD]  74.73 40.94 0 top
U13  USB PWR DIST  [SOIC8_33P94X4P93X1P63H_P65P]  68 38.48 90 top
U14  NC7WZ16  [SC_70_6PSMT]  49.33 42.21 0 top
U17  USB_ULPI_XCVR  [QFN32_5SQXP9H_P5MMP_3P45PAD]  12.63 21.72 180 top
U20  DDR3_256MX32  [FBGA136_11X14X1P1_P8MMP]  22.79 19.23 0 top
U23  16-CORE MICROPROCESSOR  [BGA324_15SQX1P5_P8MMP]  63.81 25.53 180 top
U26  HDMI/DVI XMTR  [LQFP64_10SQX1P6MMH_P5MMP]  44.38 7.87 90 top
U29  DC-TO-DC PWR SUPPLY  [TQFN16_4SQXP75H_P65P]  64.57 11.43 180 top
U30  DC-TO-DC PWR SUPPLY  [TQFN16_4SQXP75H_P65P]  65.33 45.64 180 top
U33  NC7SZ125  [SOT_5PIN]  44.38 50.6 0 top
U34  VOLT_MONITOR  [TSSOP8_3SQX1P1H_P65P]  48.44 48.18 90 top
U35  CLOCK GENERATOR  [TSSOP8_3X4P4X1P2H_P65MMP]  41.89 42.13 0 top
U36  NC7SZ125  [SOT_5PIN]  34.98 6.65 180 top
U37  ESD PROT & LEVEL SHIFT  [TSSOP24_6P4X7P9X1P2MMH_P65P]  79.05 19.48 90 top
U38  DIFF LINE RECEIVER  [QFN-10_1P55X2P05XP6XP5MMP]  53.52 26.67 270 bottom
Y1  24MHZ  [OSC4_1P6X2X7MMH]  35.99 41.96 90 top
Y2  25MHZ  [OSC4_1P6X2X7MMH]  25.45 32.44 180 top

## Library data of the parts
C7 C10 C11 C16 C24 C31 C41 C44-C47 C51 C64 C65 C68 C69 C144 C145 C196 C239 C258-C261 C263 C264 C288-C291 C297 C298 = CAP0402_0P1UF_X5R_35V: Tolerance: *; User Part Number: *; alternate symbols: (C0402_BGA)
C9 C25-C28 C32 C35-C37 C39 C50 C52 C55 C56 C58-C60 = CAP0402_0P1UF_X5R_35V: Tolerance: *; User Part Number: *; alternate symbols: (C0402_BGA); signal model: CAP_CC0402SP_0_1UF_0_1uF
C12 C17 C70 C71 C84 C134 C143 C168 C173 C179 C194 C195 C214 C216 C218 C281 C286 = CAP1210_100UF_X5R_LOESR: Tolerance: *; User Part Number: *
C13 C18 C19 C149 C162 C169 C175 C180 C181 C282 = CAP0402_4P7UF_X5R: alternate symbols: (C0402_BGA)
C14 C15 C20 C100-C103 C157-C160 C164 C165 C170 C171 C176-C178 C183-C187 C283 C307 = CAP0402_0P47UF_X5R: alternate symbols: (C0402_BGA)
C21 C78-C81 C126-C130 C135-C139 C154-C156 C188-C191 C268-C279 C285 C292-C295 = CAP0402_0P47UF_X5R: Tolerance: *; User Part Number: *; alternate symbols: (C0402_BGA)
C22 = CAP0402_0P47UF_X5R: alternate symbols: (C0402_BGA); signal model: CAP0402_10NF_X7R_16V_C0402_10NF_10nF
C23 = CAP0402_10NF_X7R_16V: alternate symbols: (C0402_BGA); signal model: CAP0402_10NF_X7R_16V_C0402_10NF_10nF
C33 C34 C38 C40 C48 C49 = CAP0603_10UF_X5R: Tolerance: *; User Part Number: *; signal model: CAP_CC0402SP_0_1UF_0_1uF
C42 C43 = CAP0402_0P1UF_X5R_35V: Tolerance: *; User Part Number: *; alternate symbols: (C0402_BGA); signal model: CAP0402_10NF_X7R_16V_C0402_10NF_10nF
C53 C172 C232 C235 C257 C267 C296 = CAP0603_10UF_X5R: Tolerance: *; User Part Number: *
C54 C62 C85 = CAP0402_6PF_NPO_50V: Tolerance: *; User Part Number: *; alternate symbols: (C0402_BGA)
C57 = CAP0402_2P2UF_X5R: Tolerance: *; User Part Number: *; alternate symbols: (C0402_BGA); signal model: CAP_CC0402SP_0_1UF_0_1uF
C61 = CAP0402_6PF_NPO_50V: Tolerance: *; User Part Number: *; alternate symbols: (C0402_BGA); signal model: CAP_CC0402SP_0_1UF_0_1uF
C63 = CAP0603_4P7UF_16V_X5R: Tolerance: *; User Part Number: *; signal model: CAP_CC0402SP_0_1UF_0_1uF
C66 = CAP0402_2P2UF_X5R: Tolerance: *; User Part Number: *; alternate symbols: (C0402_BGA)
C67 = CAP0402_0P1UF_X5R_35V: Tolerance: *; User Part Number: *; alternate symbols: (C0402_BGA); signal model: CAP0402_0P1UF_X5R_35V_0.1UF
C72 C73 C97 C99 C131-C133 C140-C142 C150-C153 C174 C182 C192 C193 C284 = CAP0402_4P7UF_X5R: Tolerance: *; User Part Number: *; alternate symbols: (C0402_BGA)
C74 = CAP0402_4P7UF_X5R: alternate symbols: (C0402_BGA); signal model: CAP0_01UF_X7R_0402_0_01UF
C75 C77 = CAP0402_0P47UF_X5R: Tolerance: *; User Part Number: *; alternate symbols: (C0402_BGA); signal model: CAP0_01UF_X7R_0402_0_01UF
C76 = CAP0402_0P47UF_X5R: alternate symbols: (C0402_BGA); signal model: CAP0_01UF_X7R_0402_0_01UF
C82 C198 C200 C202 C204 C206 C208 C210 C212 = CAP0402_10NF_X7R_16V: alternate symbols: (C0402_BGA)
C83 C96 C197 C199 C201 C203 C205 C207 C209 C211 C213 C215 C217 C219 C221 C223 C225 C227 = CAP0402_0P1UF_X5R_35V: alternate symbols: (C0402_BGA)
C95 C230 C231 C233 C234 C262 C265 C266 = CAP0402_10NF_X7R_16V: Tolerance: *; User Part Number: *; alternate symbols: (C0402_BGA)
C98 = CAP0402_4P7UF_X5R: alternate symbols: (C0402_BGA); signal model: CAP0402_0P1UF_X5R_35V_0.1UF
C104-C113 C242 C244 = CAP0402_0P047UF_X5R: Tolerance: *; User Part Number: *
C236 C237 = CAP0805_6800PF_X7R: Tolerance: *; User Part Number: *
C238 C241 C243 C245 C247 C248 C250 C253 C255 C256 = CAP0805_10UF_16V_X5R: Tolerance: *; User Part Number: *
C251 C252 C254 = CAP1UF_X5R: Tolerance: *; User Part Number: *
C287 = CAP0603_4P7UF_16V_X5R: Tolerance: *; User Part Number: *
CR1 CR5 = LED_0603_5MA_RED
CR4 CR6 CR8 CR10 = LED_0603_5MA_GRN
D1 = DIODE_BAS16XV2T1G
F1 = FUSE0603_4A: Tolerance: *; User Part Number: *
FB1 FB2 FB12 = BLM18SG121TN1D: Tolerance: *; User Part Number: *
FB3-FB7 FB14-FB18 = BLM15AG121SN1D: Tolerance: *; User Part Number: *
J2 J14 = HDR_1X3_TH_VER_0.1P: Tolerance: *; User Part Number: *
J3 = CONN_MICROSD_CARD: User Part Number: *
J5 = RJ45-10_100_1000-BELFUSE
J6 = USB_MICRO_AB_RA_SMT: Tolerance: *; User Part Number: *
J7 = USB_MICRO_B_RA_SMT: Tolerance: *; User Part Number: *
J8 J9 J11 J13 = CON_BSH_030_VERT
J10 = HDMI_MICRO_D_RA_SMT: Tolerance: *; User Part Number: *
J12 = CON_POWER_PJ002A_TH
J15 = HDR_1X2_TH_VER: Tolerance: *; User Part Number: *
L8-L11 = IND_1P5UH_2A
PTH1-PTH4 = PTH125_200PAD: Tolerance: *; User Part Number: *
R1 R3 R30 R89 R119 R120 = RES0402_240: Tolerance: *; User Part Number: *; alternate symbols: (R0402_BGA)
R4 R9 R10 R12 R18-R22 R24 R33-R40 R61 R111 R156-R159 R161-R164 R300 = RES0402_4K75: Tolerance: *; User Part Number: *; alternate symbols: (R0402_BGA)
R8 R179 = RES0402_4K75: alternate symbols: (R0402_BGA)
R11 R62 R63 R70 R178 = RES0402_1K: alternate symbols: (R0402_BGA)
R28 R66 R67 R69 R86 R160 R165-R171 R223 R237 R294 R295 R327 R328 = RES0402_1K: Tolerance: *; User Part Number: *; alternate symbols: (R0402_BGA)
R32 = RES0402_33: Tolerance: *; User Part Number: *; alternate symbols: (R0402_BGA)
R41 R42 R44 R55 R56 R82 R94 R99 R110 R114 = RES0402_22R1: Tolerance: *; User Part Number: *; alternate symbols: (R0402_BGA)
R43 R45-R48 R50-R52 = RES0402_20K: Tolerance: *; User Part Number: *; alternate symbols: (R0402_BGA)
R49 = RES0402_20K: alternate symbols: (R0402_BGA)
R59 R60 R71 R74-R78 R85 R95-R98 R101 R116 R286 R287 R290 R293 R296 R297 R329-R335 = RES0402_0: Tolerance: *; User Part Number: *; alternate symbols: (R0402_BGA)
R72 R73 R193 = RES0402_100: Tolerance: *; User Part Number: *; alternate symbols: (R0402_BGA)
R79 = RES0402_4K99: Tolerance: *; User Part Number: *; alternate symbols: (R0402_BGA)
R80 R81 R219-R222 R238 R239 R289 R291 R292 = RES0402_0: alternate symbols: (R0402_BGA)
R84 R100 R288 = RES0402_620: Tolerance: *; User Part Number: *; alternate symbols: (R0402_BGA)
R90 R106 = RES0402_8K06: Tolerance: *; User Part Number: *; alternate symbols: (R0402_BGA)
R103 R246 R247 R273 R276 R277 R280 R283-R285 R298 R299 R301 R326 = RES0402_10K: Tolerance: *; User Part Number: *; alternate symbols: (R0402_BGA)
R112 R113 = RES0402_80P6: Tolerance: *; User Part Number: *; alternate symbols: (R0402_BGA)
R115 = RES0402_80P6: alternate symbols: (R0402_BGA)
R180-R192 R194-R218 R226-R236 = RES0402_100: alternate symbols: (R0402_BGA)
R224 = RES0402_887: Tolerance: *; User Part Number: *
R225 = RES0402_27K4: Tolerance: *; User Part Number: *; alternate symbols: (R0402_BGA)
R240-R245 = RES0402_10K: alternate symbols: (R0402_BGA)
R278 = RES0603_24K9: Tolerance: *; User Part Number: *
R279 = RES0603_100K: Tolerance: *; User Part Number: *
R281 = RES0402_56K2: Tolerance: *; User Part Number: *
R282 = RES0603_69K8: Tolerance: *; User Part Number: *
R302-R324 = RES0402_33: Tolerance: *; User Part Number: *; alternate symbols: (R0402_BGA); signal model: RES0402_33_33
R325 = RES0402_10: Tolerance: *; User Part Number: *; alternate symbols: (R0402_BGA); signal model: RES0402_10_10
SW2 = SW_PB_SPST_2PIN
TP12 TP14 = TEST_TERM_BLK: Tolerance: *; User Part Number: *
TP13 TP15 = TEST_TERM_RED: Tolerance: *; User Part Number: *
U2 = ZYNQ_7Z020_CLG400
U5 U11 U14 = NC7WZ16: Tolerance: *; User Part Number: *
U7 = IC_SPI_FLASH_QUAD_128Mb
U9 = 88E1318_QFN48: Tolerance: *; User Part Number: *
U12 U17 = USB3320_ULPI_XCVR
U13 = MIC2025_1_USB_SW: Tolerance: *; User Part Number: *
U20 = DDR3_256MX32
U23 = EPIPHANY_E16G301: Tolerance: *; User Part Number: *
U26 = HDMI_DVI_XCVR_ADV7513: Tolerance: *; User Part Number: *
U29 = IC_ISL9307_DCDC_CONV
U30 = IC_ISL9305_DCDC_CONV
U33 U36 = NC7SZ125: Tolerance: *; User Part Number: XXX-XXXXX-XX
U34 = VOLTMON_4IN_3P3
U35 = IC_SI51219: Tolerance: *; User Part Number: *
U37 = TPD12S016
U38 = SN65LVDS4
Y1 = CRYSTAL_4P_24MHZ: Tolerance: *; User Part Number: *
Y2 = XTAL_4P_25MHZ: Tolerance: *; User Part Number: *

## Footprints (pads in the part's own frame, mm; a bottom-side part is the same pattern mirrored in y, then rotated)
BEAD_0603
  rect 0.762x0.965 smd: 1(0,0.8) 2(0,-0.8)
BGA324_15SQX1P5_P8MMP
  round 0.4 smd: A1(-6.8,6.8) A2(-6,6.8) A3(-5.2,6.8) A4(-4.4,6.8) A5(-3.6,6.8) A6(-2.8,6.8) A7(-2,6.8) A8(-1.2,6.8) A9(-0.4,6.8) A10(0.4,6.8) A11(1.2,6.8) A12(2,6.8) A13(2.8,6.8) A14(3.6,6.8) A15(4.4,6.8) A16(5.2,6.8) A17(6,6.8) A18(6.8,6.8) B1(-6.8,6) B2(-6,6) B3(-5.2,6) B4(-4.4,6) B5(-3.6,6) B6(-2.8,6) B7(-2,6) B8(-1.2,6) B9(-0.4,6) B10(0.4,6) B11(1.2,6) B12(2,6) B13(2.8,6) B14(3.6,6) B15(4.4,6) B16(5.2,6) B17(6,6) B18(6.8,6) C1(-6.8,5.2) C2(-6,5.2) C3(-5.2,5.2) C4(-4.4,5.2) C5(-3.6,5.2) C6(-2.8,5.2) C7(-2,5.2) C8(-1.2,5.2) C9(-0.4,5.2) C10(0.4,5.2) C11(1.2,5.2) C12(2,5.2) C13(2.8,5.2) C14(3.6,5.2) C15(4.4,5.2) C16(5.2,5.2) C17(6,5.2) C18(6.8,5.2) D1(-6.8,4.4) D2(-6,4.4) D3(-5.2,4.4) D4(-4.4,4.4) D5(-3.6,4.4) D6(-2.8,4.4) D7(-2,4.4) D8(-1.2,4.4) D9(-0.4,4.4) D10(0.4,4.4) D11(1.2,4.4) D12(2,4.4) D13(2.8,4.4) D14(3.6,4.4) D15(4.4,4.4) D16(5.2,4.4) D17(6,4.4) D18(6.8,4.4) E1(-6.8,3.6) E2(-6,3.6) E3(-5.2,3.6) E4(-4.4,3.6) E5(-3.6,3.6) E6(-2.8,3.6) E7(-2,3.6) E8(-1.2,3.6) E9(-0.4,3.6) E10(0.4,3.6) E11(1.2,3.6) E12(2,3.6) E13(2.8,3.6) E14(3.6,3.6) E15(4.4,3.6) E16(5.2,3.6) E17(6,3.6) E18(6.8,3.6) F1(-6.8,2.8) F2(-6,2.8) F3(-5.2,2.8) F4(-4.4,2.8) F5(-3.6,2.8) F6(-2.8,2.8) F7(-2,2.8) F8(-1.2,2.8) F9(-0.4,2.8) F10(0.4,2.8) F11(1.2,2.8) F12(2,2.8) F13(2.8,2.8) F14(3.6,2.8) F15(4.4,2.8) F16(5.2,2.8) F17(6,2.8) F18(6.8,2.8) G1(-6.8,2) G2(-6,2) G3(-5.2,2) G4(-4.4,2) G5(-3.6,2) G6(-2.8,2) G7(-2,2) G8(-1.2,2) G9(-0.4,2) G10(0.4,2) G11(1.2,2) G12(2,2) G13(2.8,2) G14(3.6,2) G15(4.4,2) G16(5.2,2) G17(6,2) G18(6.8,2) H1(-6.8,1.2) H2(-6,1.2) H3(-5.2,1.2) H4(-4.4,1.2) H5(-3.6,1.2) H6(-2.8,1.2) H7(-2,1.2) H8(-1.2,1.2) H9(-0.4,1.2) H10(0.4,1.2) H11(1.2,1.2) H12(2,1.2) H13(2.8,1.2) H14(3.6,1.2) H15(4.4,1.2) H16(5.2,1.2) H17(6,1.2) H18(6.8,1.2) J1(-6.8,0.4) J2(-6,0.4) J3(-5.2,0.4) J4(-4.4,0.4) J5(-3.6,0.4) J6(-2.8,0.4) J7(-2,0.4) J8(-1.2,0.4) J9(-0.4,0.4) J10(0.4,0.4) J11(1.2,0.4) J12(2,0.4) J13(2.8,0.4) J14(3.6,0.4) J15(4.4,0.4) J16(5.2,0.4) J17(6,0.4) J18(6.8,0.4) K1(-6.8,-0.4) K2(-6,-0.4) K3(-5.2,-0.4) K4(-4.4,-0.4) K5(-3.6,-0.4) K6(-2.8,-0.4) K7(-2,-0.4) K8(-1.2,-0.4) K9(-0.4,-0.4) K10(0.4,-0.4) K11(1.2,-0.4) K12(2,-0.4) K13(2.8,-0.4) K14(3.6,-0.4) K15(4.4,-0.4) K16(5.2,-0.4) K17(6,-0.4) K18(6.8,-0.4) L1(-6.8,-1.2) L2(-6,-1.2) L3(-5.2,-1.2) L4(-4.4,-1.2) L5(-3.6,-1.2) L6(-2.8,-1.2) L7(-2,-1.2) L8(-1.2,-1.2) L9(-0.4,-1.2) L10(0.4,-1.2) L11(1.2,-1.2) L12(2,-1.2) L13(2.8,-1.2) L14(3.6,-1.2) L15(4.4,-1.2) L16(5.2,-1.2) L17(6,-1.2) L18(6.8,-1.2) M1(-6.8,-2) M2(-6,-2) M3(-5.2,-2) M4(-4.4,-2) M5(-3.6,-2) M6(-2.8,-2) M7(-2,-2) M8(-1.2,-2) M9(-0.4,-2) M10(0.4,-2) M11(1.2,-2) M12(2,-2) M13(2.8,-2) M14(3.6,-2) M15(4.4,-2) M16(5.2,-2) M17(6,-2) M18(6.8,-2) N1(-6.8,-2.8) N2(-6,-2.8) N3(-5.2,-2.8) N4(-4.4,-2.8) N5(-3.6,-2.8) N6(-2.8,-2.8) N7(-2,-2.8) N8(-1.2,-2.8) N9(-0.4,-2.8) N10(0.4,-2.8) N11(1.2,-2.8) N12(2,-2.8) N13(2.8,-2.8) N14(3.6,-2.8) N15(4.4,-2.8) N16(5.2,-2.8) N17(6,-2.8) N18(6.8,-2.8) P1(-6.8,-3.6) P2(-6,-3.6) P3(-5.2,-3.6) P4(-4.4,-3.6) P5(-3.6,-3.6) P6(-2.8,-3.6) P7(-2,-3.6) P8(-1.2,-3.6) P9(-0.4,-3.6) P10(0.4,-3.6) P11(1.2,-3.6) P12(2,-3.6) P13(2.8,-3.6) P14(3.6,-3.6) P15(4.4,-3.6) P16(5.2,-3.6) P17(6,-3.6) P18(6.8,-3.6) R1(-6.8,-4.4) R2(-6,-4.4) R3(-5.2,-4.4) R4(-4.4,-4.4) R5(-3.6,-4.4) R6(-2.8,-4.4) R7(-2,-4.4) R8(-1.2,-4.4) R9(-0.4,-4.4) R10(0.4,-4.4) R11(1.2,-4.4) R12(2,-4.4) R13(2.8,-4.4) R14(3.6,-4.4) R15(4.4,-4.4) R16(5.2,-4.4) R17(6,-4.4) R18(6.8,-4.4) T1(-6.8,-5.2) T2(-6,-5.2) T3(-5.2,-5.2) T4(-4.4,-5.2) T5(-3.6,-5.2) T6(-2.8,-5.2) T7(-2,-5.2) T8(-1.2,-5.2) T9(-0.4,-5.2) T10(0.4,-5.2) T11(1.2,-5.2) T12(2,-5.2) T13(2.8,-5.2) T14(3.6,-5.2) T15(4.4,-5.2) T16(5.2,-5.2) T17(6,-5.2) T18(6.8,-5.2) U1(-6.8,-6) U2(-6,-6) U3(-5.2,-6) U4(-4.4,-6) U5(-3.6,-6) U6(-2.8,-6) U7(-2,-6) U8(-1.2,-6) U9(-0.4,-6) U10(0.4,-6) U11(1.2,-6) U12(2,-6) U13(2.8,-6) U14(3.6,-6) U15(4.4,-6) U16(5.2,-6) U17(6,-6) U18(6.8,-6) V1(-6.8,-6.8) V2(-6,-6.8) V3(-5.2,-6.8) V4(-4.4,-6.8) V5(-3.6,-6.8) V6(-2.8,-6.8) V7(-2,-6.8) V8(-1.2,-6.8) V9(-0.4,-6.8) V10(0.4,-6.8) V11(1.2,-6.8) V12(2,-6.8) V13(2.8,-6.8) V14(3.6,-6.8) V15(4.4,-6.8) V16(5.2,-6.8) V17(6,-6.8) V18(6.8,-6.8)
C0402
  rect 0.508x0.533 smd: 1(0,0.419) 2(0,-0.419)
C0402#2
  rect 0.5x0.55 smd: 1(-0.4,0) 2(0.4,0)
C0603
  rect 0.762x0.965 smd: 1(0,0.8) 2(0,-0.8)
C0805
  rect 1.422x1.397 smd: 1(0,1.143) 2(0,-1.143)
C1210
  rect 2.591x1.626 smd: 1(0,1.651) 2(0,-1.651)
CBGA400_17SQ_1P6H_P8MMP
  round 0.457 smd: A1(-7.6,7.6) A2(-6.8,7.6) A3(-6,7.6) A4(-5.2,7.6) A5(-4.4,7.6) A6(-3.6,7.6) A7(-2.8,7.6) A8(-2,7.6) A9(-1.2,7.6) A10(-0.4,7.6) A11(0.4,7.6) A12(1.2,7.6) A13(2,7.6) A14(2.8,7.6) A15(3.6,7.6) A16(4.4,7.6) A17(5.2,7.6) A18(6,7.6) A19(6.8,7.6) A20(7.6,7.6) B1(-7.6,6.8) B2(-6.8,6.8) B3(-6,6.8) B4(-5.2,6.8) B5(-4.4,6.8) B6(-3.6,6.8) B7(-2.8,6.8) B8(-2,6.8) B9(-1.2,6.8) B10(-0.4,6.8) B11(0.4,6.8) B12(1.2,6.8) B13(2,6.8) B14(2.8,6.8) B15(3.6,6.8) B16(4.4,6.8) B17(5.2,6.8) B18(6,6.8) B19(6.8,6.8) B20(7.6,6.8) C1(-7.6,6) C2(-6.8,6) C3(-6,6) C4(-5.2,6) C5(-4.4,6) C6(-3.6,6) C7(-2.8,6) C8(-2,6) C9(-1.2,6) C10(-0.4,6) C11(0.4,6) C12(1.2,6) C13(2,6) C14(2.8,6) C15(3.6,6) C16(4.4,6) C17(5.2,6) C18(6,6) C19(6.8,6) C20(7.6,6) D1(-7.6,5.2) D2(-6.8,5.2) D3(-6,5.2) D4(-5.2,5.2) D5(-4.4,5.2) D6(-3.6,5.2) D7(-2.8,5.2) D8(-2,5.2) D9(-1.2,5.2) D10(-0.4,5.2) D11(0.4,5.2) D12(1.2,5.2) D13(2,5.2) D14(2.8,5.2) D15(3.6,5.2) D16(4.4,5.2) D17(5.2,5.2) D18(6,5.2) D19(6.8,5.2) D20(7.6,5.2) E1(-7.6,4.4) E2(-6.8,4.4) E3(-6,4.4) E4(-5.2,4.4) E5(-4.4,4.4) E6(-3.6,4.4) E7(-2.8,4.4) E8(-2,4.4) E9(-1.2,4.4) E10(-0.4,4.4) E11(0.4,4.4) E12(1.2,4.4) E13(2,4.4) E14(2.8,4.4) E15(3.6,4.4) E16(4.4,4.4) E17(5.2,4.4) E18(6,4.4) E19(6.8,4.4) E20(7.6,4.4) F1(-7.6,3.6) F2(-6.8,3.6) F3(-6,3.6) F4(-5.2,3.6) F5(-4.4,3.6) F6(-3.6,3.6) F7(-2.8,3.6) F8(-2,3.6) F9(-1.2,3.6) F10(-0.4,3.6) F11(0.4,3.6) F12(1.2,3.6) F13(2,3.6) F14(2.8,3.6) F15(3.6,3.6) F16(4.4,3.6) F17(5.2,3.6) F18(6,3.6) F19(6.8,3.6) F20(7.6,3.6) G1(-7.6,2.8) G2(-6.8,2.8) G3(-6,2.8) G4(-5.2,2.8) G5(-4.4,2.8) G6(-3.6,2.8) G7(-2.8,2.8) G8(-2,2.8) G9(-1.2,2.8) G10(-0.4,2.8) G11(0.4,2.8) G12(1.2,2.8) G13(2,2.8) G14(2.8,2.8) G15(3.6,2.8) G16(4.4,2.8) G17(5.2,2.8) G18(6,2.8) G19(6.8,2.8) G20(7.6,2.8) H1(-7.6,2) H2(-6.8,2) H3(-6,2) H4(-5.2,2) H5(-4.4,2) H6(-3.6,2) H7(-2.8,2) H8(-2,2) H9(-1.2,2) H10(-0.4,2) H11(0.4,2) H12(1.2,2) H13(2,2) H14(2.8,2) H15(3.6,2) H16(4.4,2) H17(5.2,2) H18(6,2) H19(6.8,2) H20(7.6,2) J1(-7.6,1.2) J2(-6.8,1.2) J3(-6,1.2) J4(-5.2,1.2) J5(-4.4,1.2) J6(-3.6,1.2) J7(-2.8,1.2) J8(-2,1.2) J9(-1.2,1.2) J10(-0.4,1.2) J11(0.4,1.2) J12(1.2,1.2) J13(2,1.2) J14(2.8,1.2) J15(3.6,1.2) J16(4.4,1.2) J17(5.2,1.2) J18(6,1.2) J19(6.8,1.2) J20(7.6,1.2) K1(-7.6,0.4) K2(-6.8,0.4) K3(-6,0.4) K4(-5.2,0.4) K5(-4.4,0.4) K6(-3.6,0.4) K7(-2.8,0.4) K8(-2,0.4) K9(-1.2,0.4) K10(-0.4,0.4) K11(0.4,0.4) K12(1.2,0.4) K13(2,0.4) K14(2.8,0.4) K15(3.6,0.4) K16(4.4,0.4) K17(5.2,0.4) K18(6,0.4) K19(6.8,0.4) K20(7.6,0.4) L1(-7.6,-0.4) L2(-6.8,-0.4) L3(-6,-0.4) L4(-5.2,-0.4) L5(-4.4,-0.4) L6(-3.6,-0.4) L7(-2.8,-0.4) L8(-2,-0.4) L9(-1.2,-0.4) L10(-0.4,-0.4) L11(0.4,-0.4) L12(1.2,-0.4) L13(2,-0.4) L14(2.8,-0.4) L15(3.6,-0.4) L16(4.4,-0.4) L17(5.2,-0.4) L18(6,-0.4) L19(6.8,-0.4) L20(7.6,-0.4) M1(-7.6,-1.2) M2(-6.8,-1.2) M3(-6,-1.2) M4(-5.2,-1.2) M5(-4.4,-1.2) M6(-3.6,-1.2) M7(-2.8,-1.2) M8(-2,-1.2) M9(-1.2,-1.2) M10(-0.4,-1.2) M11(0.4,-1.2) M12(1.2,-1.2) M13(2,-1.2) M14(2.8,-1.2) M15(3.6,-1.2) M16(4.4,-1.2) M17(5.2,-1.2) M18(6,-1.2) M19(6.8,-1.2) M20(7.6,-1.2) N1(-7.6,-2) N2(-6.8,-2) N3(-6,-2) N4(-5.2,-2) N5(-4.4,-2) N6(-3.6,-2) N7(-2.8,-2) N8(-2,-2) N9(-1.2,-2) N10(-0.4,-2) N11(0.4,-2) N12(1.2,-2) N13(2,-2) N14(2.8,-2) N15(3.6,-2) N16(4.4,-2) N17(5.2,-2) N18(6,-2) N19(6.8,-2) N20(7.6,-2) P1(-7.6,-2.8) P2(-6.8,-2.8) P3(-6,-2.8) P4(-5.2,-2.8) P5(-4.4,-2.8) P6(-3.6,-2.8) P7(-2.8,-2.8) P8(-2,-2.8) P9(-1.2,-2.8) P10(-0.4,-2.8) P11(0.4,-2.8) P12(1.2,-2.8) P13(2,-2.8) P14(2.8,-2.8) P15(3.6,-2.8) P16(4.4,-2.8) P17(5.2,-2.8) P18(6,-2.8) P19(6.8,-2.8) P20(7.6,-2.8) R1(-7.6,-3.6) R2(-6.8,-3.6) R3(-6,-3.6) R4(-5.2,-3.6) R5(-4.4,-3.6) R6(-3.6,-3.6) R7(-2.8,-3.6) R8(-2,-3.6) R9(-1.2,-3.6) R10(-0.4,-3.6) R11(0.4,-3.6) R12(1.2,-3.6) R13(2,-3.6) R14(2.8,-3.6) R15(3.6,-3.6) R16(4.4,-3.6) R17(5.2,-3.6) R18(6,-3.6) R19(6.8,-3.6) R20(7.6,-3.6) T1(-7.6,-4.4) T2(-6.8,-4.4) T3(-6,-4.4) T4(-5.2,-4.4) T5(-4.4,-4.4) T6(-3.6,-4.4) T7(-2.8,-4.4) T8(-2,-4.4) T9(-1.2,-4.4) T10(-0.4,-4.4) T11(0.4,-4.4) T12(1.2,-4.4) T13(2,-4.4) T14(2.8,-4.4) T15(3.6,-4.4) T16(4.4,-4.4) T17(5.2,-4.4) T18(6,-4.4) T19(6.8,-4.4) T20(7.6,-4.4) U1(-7.6,-5.2) U2(-6.8,-5.2) U3(-6,-5.2) U4(-5.2,-5.2) U5(-4.4,-5.2) U6(-3.6,-5.2) U7(-2.8,-5.2) U8(-2,-5.2) U9(-1.2,-5.2) U10(-0.4,-5.2) U11(0.4,-5.2) U12(1.2,-5.2) U13(2,-5.2) U14(2.8,-5.2) U15(3.6,-5.2) U16(4.4,-5.2) U17(5.2,-5.2) U18(6,-5.2) U19(6.8,-5.2) U20(7.6,-5.2) V1(-7.6,-6) V2(-6.8,-6) V3(-6,-6) V4(-5.2,-6) V5(-4.4,-6) V6(-3.6,-6) V7(-2.8,-6) V8(-2,-6) V9(-1.2,-6) V10(-0.4,-6) V11(0.4,-6) V12(1.2,-6) V13(2,-6) V14(2.8,-6) V15(3.6,-6) V16(4.4,-6) V17(5.2,-6) V18(6,-6) V19(6.8,-6) V20(7.6,-6) W1(-7.6,-6.8) W2(-6.8,-6.8) W3(-6,-6.8) W4(-5.2,-6.8) W5(-4.4,-6.8) W6(-3.6,-6.8) W7(-2.8,-6.8) W8(-2,-6.8) W9(-1.2,-6.8) W10(-0.4,-6.8) W11(0.4,-6.8) W12(1.2,-6.8) W13(2,-6.8) W14(2.8,-6.8) W15(3.6,-6.8) W16(4.4,-6.8) W17(5.2,-6.8) W18(6,-6.8) W19(6.8,-6.8) W20(7.6,-6.8) Y1(-7.6,-7.6) Y2(-6.8,-7.6) Y3(-6,-7.6) Y4(-5.2,-7.6) Y5(-4.4,-7.6) Y6(-3.6,-7.6) Y7(-2.8,-7.6) Y8(-2,-7.6) Y9(-1.2,-7.6) Y10(-0.4,-7.6) Y11(0.4,-7.6) Y12(1.2,-7.6) Y13(2,-7.6) Y14(2.8,-7.6) Y15(3.6,-7.6) Y16(4.4,-7.6) Y17(5.2,-7.6) Y18(6,-7.6) Y19(6.8,-7.6) Y20(7.6,-7.6)
CONN_BSH60P_13P59X25P88_P5P_V
  round 0.508 hole 1.016 unplated: (-10.063,2.666) (10.063,2.666)
  rect 0.279x2.273 smd: 1(-7.25,-2.864) 2(-7.25,2.864) 3(-6.75,-2.864) 4(-6.75,2.864) 5(-6.25,-2.864) 6(-6.25,2.864) 7(-5.75,-2.864) 8(-5.75,2.864) 9(-5.25,-2.864) 10(-5.25,2.864) 11(-4.75,-2.864) 12(-4.75,2.864) 13(-4.25,-2.864) 14(-4.25,2.864) 15(-3.75,-2.864) 16(-3.75,2.864) 17(-3.25,-2.864) 18(-3.25,2.864) 19(-2.75,-2.864) 20(-2.75,2.864) 21(-2.25,-2.864) 22(-2.25,2.864) 23(-1.75,-2.864) 24(-1.75,2.864) 25(-1.25,-2.864) 26(-1.25,2.864) 27(-0.75,-2.864) 28(-0.75,2.864) 29(-0.25,-2.864) 30(-0.25,2.864) 31(0.25,-2.864) 32(0.25,2.864) 33(0.75,-2.864) 34(0.75,2.864) 35(1.25,-2.864) 36(1.25,2.864) 37(1.75,-2.864) 38(1.75,2.864) 39(2.25,-2.864) 40(2.25,2.864) 41(2.75,-2.864) 42(2.75,2.864) 43(3.25,-2.864) 44(3.25,2.864) 45(3.75,-2.864) 46(3.75,2.864) 47(4.25,-2.864) 48(4.25,2.864) 49(4.75,-2.864) 50(4.75,2.864) 51(5.25,-2.864) 52(5.25,2.864) 53(5.75,-2.864) 54(5.75,2.864) 55(6.25,-2.864) 56(6.25,2.864) 57(6.75,-2.864) 58(6.75,2.864) 59(7.25,-2.864) 60(7.25,2.864)
DC_PWR_JCK_9X14P4X11MMH
  oval 1.397x3.886 hole 1x3.5: 1(0,0)
  oval 1.397x3.886 hole 1x3: 2(6,0)
  oval 3.886x1.397 hole 3x1: 3(3,4.7)
F0603
  rect 0.762x0.965 smd: 1(0,0.8) 2(0,-0.8)
FBEAD_0402
  rect 0.508x0.533 smd: 1(0,0.419) 2(0,-0.419)
FBGA136_11X14X1P1_P8MMP
  round 0.4 smd: A1(-4.4,6.4) A2(-3.6,6.4) A3(-2.8,6.4) A4(-2,6.4) A9(2,6.4) A10(2.8,6.4) A11(3.6,6.4) A12(4.4,6.4) B1(-4.4,5.6) B2(-3.6,5.6) B3(-2.8,5.6) B4(-2,5.6) B9(2,5.6) B10(2.8,5.6) B11(3.6,5.6) B12(4.4,5.6) C1(-4.4,4.8) C2(-3.6,4.8) C3(-2.8,4.8) C4(-2,4.8) C9(2,4.8) C10(2.8,4.8) C11(3.6,4.8) C12(4.4,4.8) D1(-4.4,4) D2(-3.6,4) D3(-2.8,4) D4(-2,4) D9(2,4) D10(2.8,4) D11(3.6,4) D12(4.4,4) E1(-4.4,3.2) E2(-3.6,3.2) E3(-2.8,3.2) E4(-2,3.2) E9(2,3.2) E10(2.8,3.2) E11(3.6,3.2) E12(4.4,3.2) F1(-4.4,2.4) F2(-3.6,2.4) F3(-2.8,2.4) F4(-2,2.4) F9(2,2.4) F10(2.8,2.4) F11(3.6,2.4) F12(4.4,2.4) G1(-4.4,1.6) G2(-3.6,1.6) G3(-2.8,1.6) G4(-2,1.6) G9(2,1.6) G10(2.8,1.6) G11(3.6,1.6) G12(4.4,1.6) H1(-4.4,0.8) H2(-3.6,0.8) H3(-2.8,0.8) H4(-2,0.8) H9(2,0.8) H10(2.8,0.8) H11(3.6,0.8) H12(4.4,0.8) J1(-4.4,0) J2(-3.6,0) J3(-2.8,0) J4(-2,0) J9(2,0) J10(2.8,0) J11(3.6,0) J12(4.4,0) K1(-4.4,-0.8) K2(-3.6,-0.8) K3(-2.8,-0.8) K4(-2,-0.8) K9(2,-0.8) K10(2.8,-0.8) K11(3.6,-0.8) K12(4.4,-0.8) L1(-4.4,-1.6) L2(-3.6,-1.6) L3(-2.8,-1.6) L4(-2,-1.6) L9(2,-1.6) L10(2.8,-1.6) L11(3.6,-1.6) L12(4.4,-1.6) M1(-4.4,-2.4) M2(-3.6,-2.4) M3(-2.8,-2.4) M4(-2,-2.4) M9(2,-2.4) M10(2.8,-2.4) M11(3.6,-2.4) M12(4.4,-2.4) N1(-4.4,-3.2) N2(-3.6,-3.2) N3(-2.8,-3.2) N4(-2,-3.2) N9(2,-3.2) N10(2.8,-3.2) N11(3.6,-3.2) N12(4.4,-3.2) P1(-4.4,-4) P2(-3.6,-4) P3(-2.8,-4) P4(-2,-4) P9(2,-4) P10(2.8,-4) P11(3.6,-4) P12(4.4,-4) R1(-4.4,-4.8) R2(-3.6,-4.8) R3(-2.8,-4.8) R4(-2,-4.8) R9(2,-4.8) R10(2.8,-4.8) R11(3.6,-4.8) R12(4.4,-4.8) T1(-4.4,-5.6) T2(-3.6,-5.6) T3(-2.8,-5.6) T4(-2,-5.6) T9(2,-5.6) T10(2.8,-5.6) T11(3.6,-5.6) T12(4.4,-5.6) U1(-4.4,-6.4) U2(-3.6,-6.4) U3(-2.8,-6.4) U4(-2,-6.4) U9(2,-6.4) U10(2.8,-6.4) U11(3.6,-6.4) U12(4.4,-6.4)
